# Altium PCB MainBoardPCB1.PcbDoc (part 9 of 40)
Units mm, origin at the board's own origin, x right, y up, seen from the top; angles counter-clockwise.
Board outline 258.95 x 308.86 mm, 16 copper layers (L1, L2 (GND), L3 (Sign), L4 (GND), L5 (Sign), L6 (PWR/GND), L7(PWR/GND), L8 (Plane_GND), L9 (PWR/GND), L10 (PWR/GND), L11 (PWR/GND), L12 (Sign), L13 (GND), L14 (Sign), L15 (GND), L16), stack 2.502 mm thick; 2397 components, 1744 nets, 8397 pads, 4112 vias.
Unrouted connection lines stored in the file: 3547.
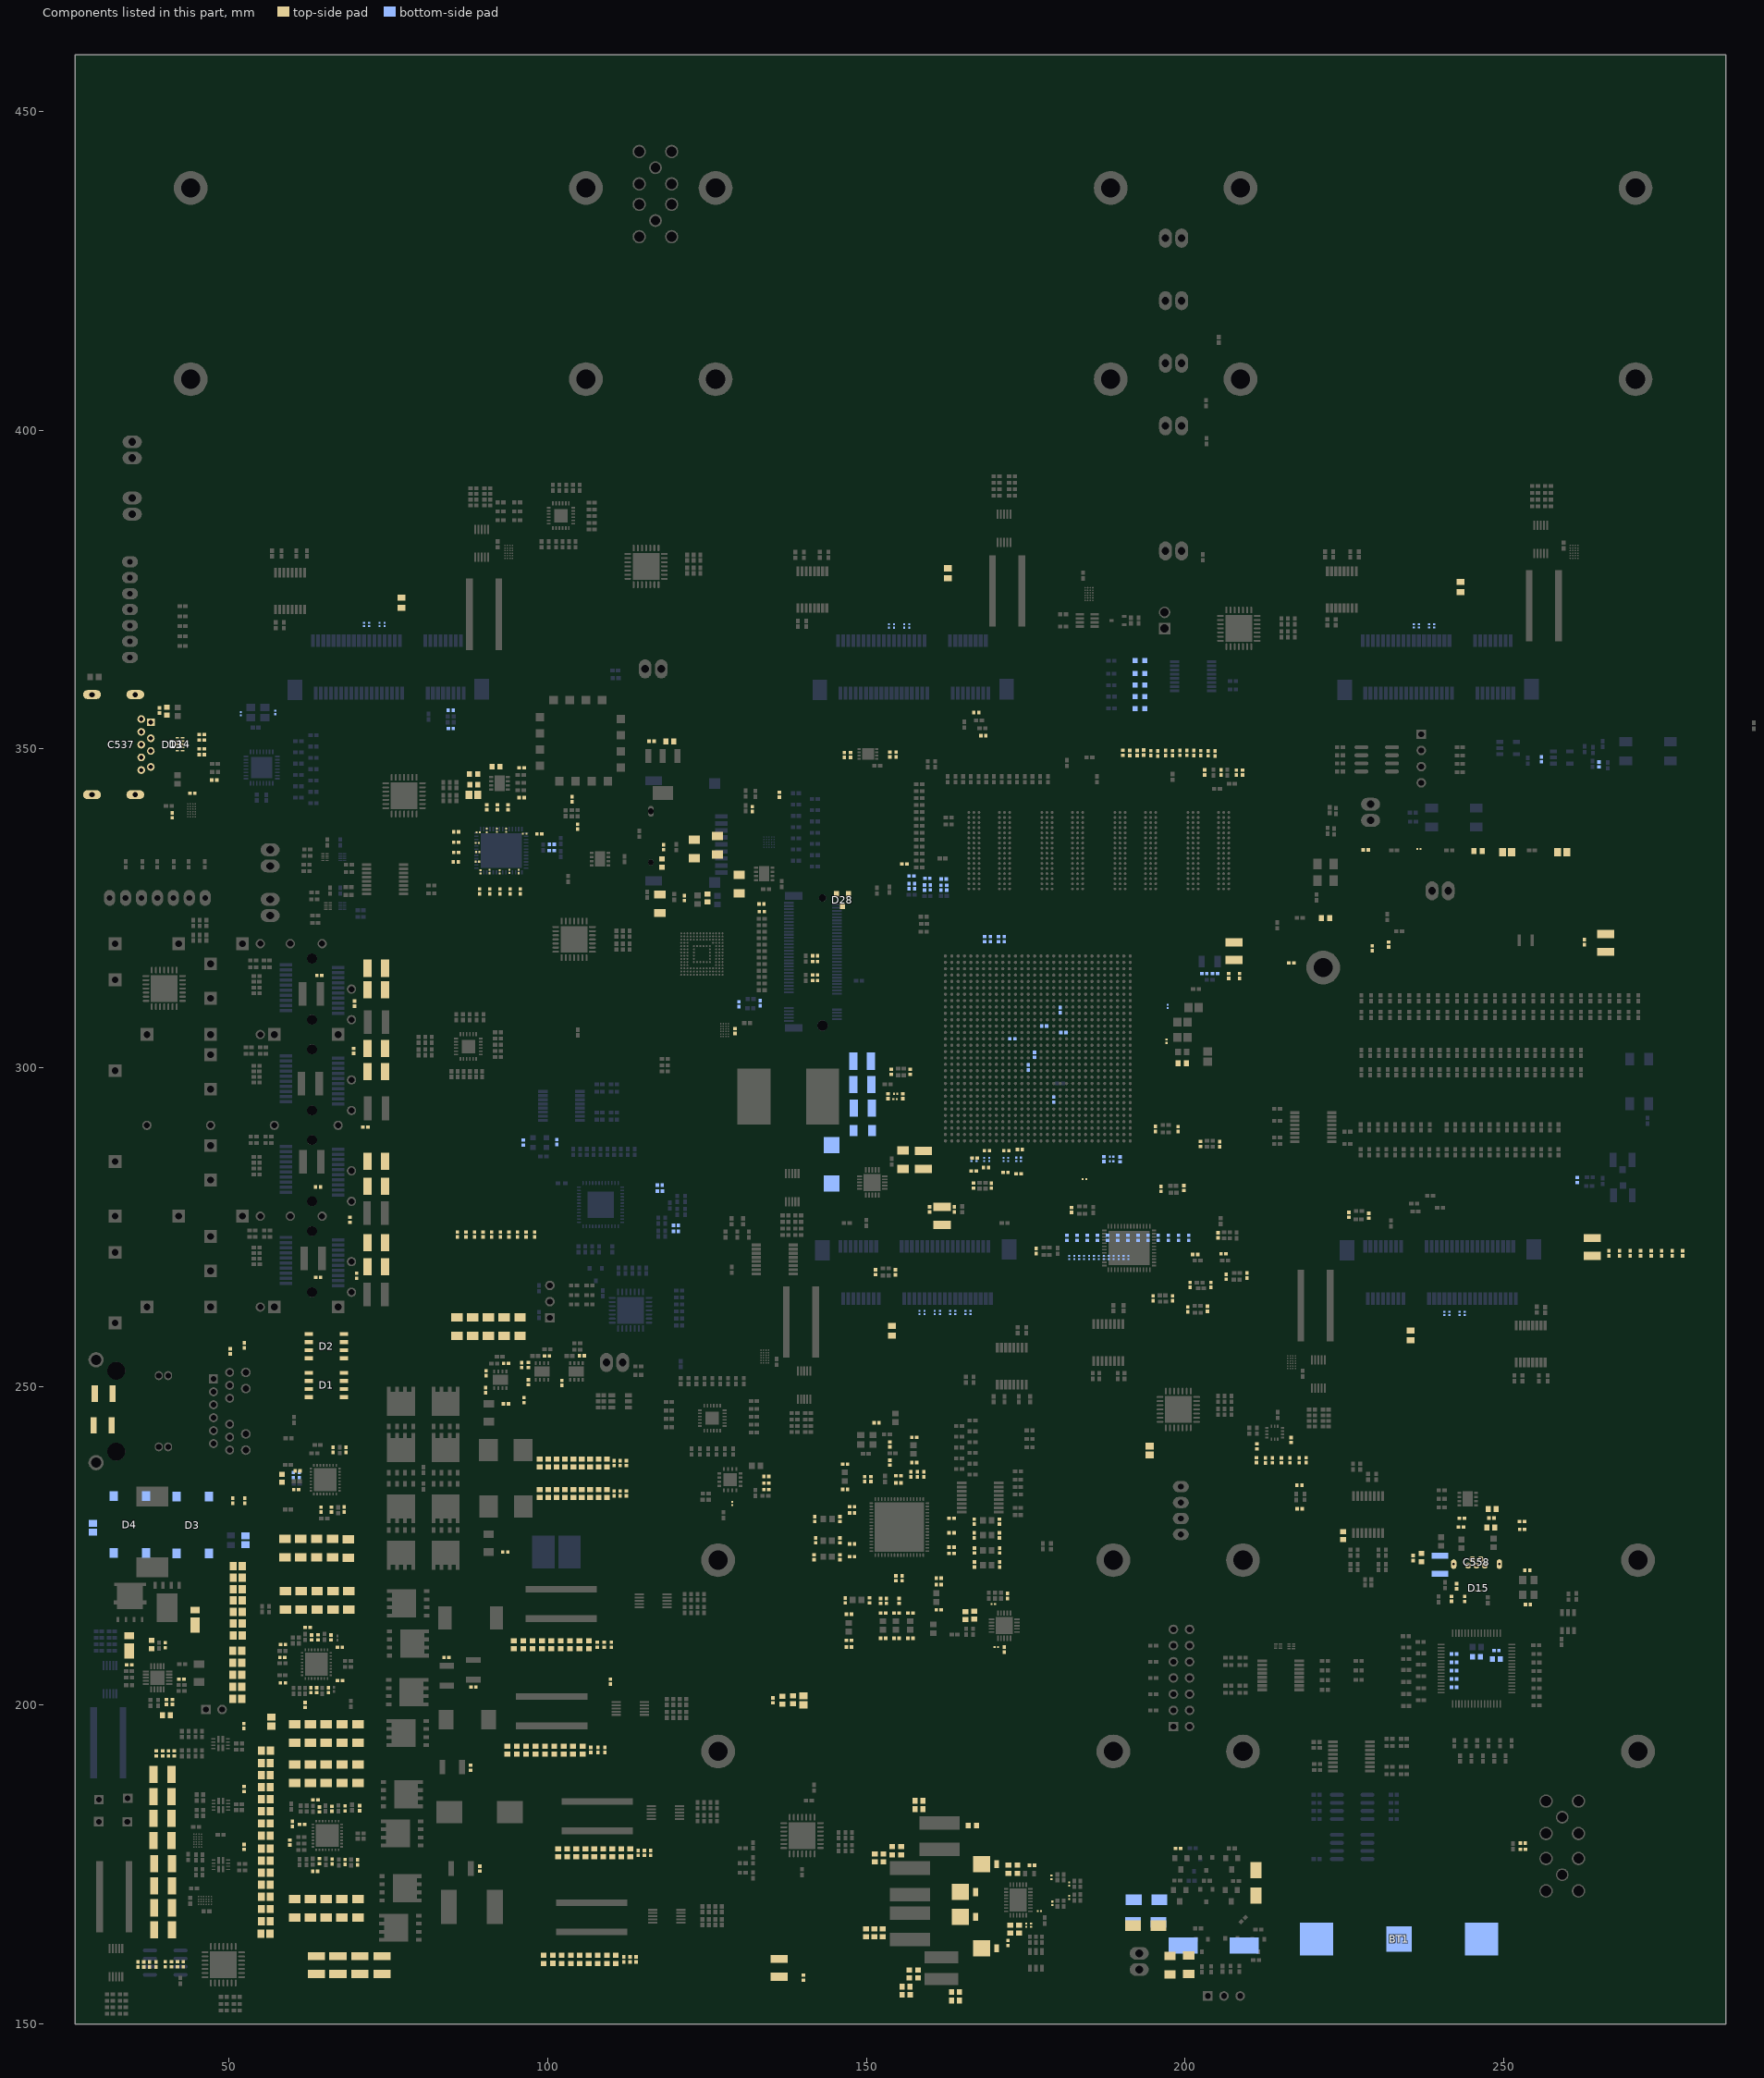
[diagram p19: the components of this part, seen from the top]

## Part data (continued)
C518 C520 C567_5V_to_3V3_for_FTDI C586 C587: library part Capacitor, "CAP CER 2.2UF 6.3V X5R 0402", Case/Package=0402, Case Code (Metric)=1005, Dielectric=X5R, Manufacturer="Taiyo Yuden", Manufacturer Part Number=JMK105BJ225KV-F, Max Operating Temperature=85°C, Min Operating Temperature=-55°C, Package Quantity=10000, Supplier Part Number 1=587-5867-1-ND, Tolerance=10%, Voltage Rating=6.3V, Capacitance=2.2uF, Case Code (Imperial)=0402, Category="Ceramic Capacitors", ComponentLink1Description=https://datasheet.ciiva.com/15921/tmk105b7103kv-15921011.pdf?src-supplier=Onlinecomponents.com, ComponentLink1URL=https://datasheet.ciiva.com/15921/tmk105b7103kv-15921011.pdf?src-supplier=Onlinecomponents.com, ComponentLink2Description=https://datasheet.ciiva.com/30178/cmultilayerceramiccapacitor-30178599.pdf?src-supplier=Onlinecomponents.com, ComponentLink2URL=https://datasheet.ciiva.com/30178/cmultilayerceramiccapacitor-30178599.pdf?src-supplier=Onlinecomponents.com, Composition=Ceramic, Depth=0.5mm, Height=0.5mm, Length=1mm, Mount="Surface Mount", Packaging="Tape and Reel", Pricing 1="1=0,10000, 10=0,06000, 100=0,02650, 500=0,01894, 1000=0,01488, 2500=0,01352, 5000=0,01244 (USD)", Radiation Hardening=No, RoHS=Yes, Stock 1=4812, Supplier 1=Digi-Key, Termination=SMD/SMT, Thickness=0.022inch, Voltage Rating (DC)=6.3V, Width=0.5mm
C525 C526 C527 C528 C529 C530: library part Capacitor, Case Code (Imperial)=0402, Case Code (Metric)=1005, Dielectric=X7R, Dielectric Material=Ceramic, Manufacturer=KEMET, Manufacturer Part Number=C0402C103K8RACAUTO, Max Operating Temperature=125°C, Min Operating Temperature=-55°C, Package Quantity=1, Ratings=AEC-Q200, Supplier Part Number 1=399-6827-1-ND, Tolerance=10%, Voltage Rating=10V, Capacitance=10nF, Case/Package=0402, ComponentLink1Description=https://datasheet.ciiva.com/6255/datasheetpn-c0402c103k8racauto-6255096.pdf?src-supplier=Digi-Key, ComponentLink1URL=https://datasheet.ciiva.com/6255/datasheetpn-c0402c103k8racauto-6255096.pdf?src-supplier=Digi-Key, Length=0.039inch, Mount="Surface Mount", Packaging="Cut Tape", Pricing 1="1 = 0,10000, 10 = 0,06800, 100 = 0,03020, 500 = 0,02158, 1000 = 0,01695, 2500 = 0,01541, 5000 = 0,01418 (USD)", REACH SVHC="No SVHC", RoHS=Yes, Stock 1=59295, Supplier 1=Digi-Key, Thickness=0.022inch, Voltage Rating (DC)=10V, Width=0.02inch
C531 C532 C533 C534 C588 C589 C592: library part Capacitor, "Cap Ceramic 0.1uF 25V X7R 20% SMD 0402 125C Paper T/R", Case Code (Imperial)=0402, Case Code (Metric)=1005, Dielectric=X7R, Manufacturer=Murata, Manufacturer Part Number=GRM155R71E104ME14D, Max Operating Temperature=125°C, Min Operating Temperature=-55°C, Package Quantity=10000, Supplier Part Number 1=490-13341-1-ND, Tolerance=20%, Voltage Rating=25V, Capacitance=100nF, Case/Package=0402, Category="Ceramic Capacitors", ComponentLink1Description=http://www.mouser.com/ds/2/281/c02e-2905.pdf?src-supplier=Mouser, ComponentLink1URL=http://www.mouser.com/ds/2/281/c02e-2905.pdf?src-supplier=Mouser, ComponentLink2Description=http://components.arrow.com/part/dataview/0323_07278596?src-supplier=Arrow+Europe, ComponentLink2URL=http://components.arrow.com/part/dataview/0323_07278596?src-supplier=Arrow+Europe, ComponentLink3Description=http://search.murata.co.jp/Ceramy/image/img/A01X/partnumbering_e_01.pdf?src-supplier=Digi-Key, ComponentLink3URL=http://search.murata.co.jp/Ceramy/image/img/A01X/partnumbering_e_01.pdf?src-supplier=Digi-Key, ComponentLink4Description=http://search.murata.co.jp/Ceramy/image/img/A01X/G101/ENG/GRM155R71E104ME14-01.pdf?src-supplier=Digi-Key, ComponentLink4URL=http://search.murata.co.jp/Ceramy/image/img/A01X/G101/ENG/GRM155R71E104ME14-01.pdf?src-supplier=Digi-Key, Composition=Ceramic, Depth=0.5mm, Height=0.5mm, Lead Free="Lead Free", Length=1mm, Material=Ceramic, Mount="Surface Mount", Packaging="Tape and Reel", Pricing 1="1=0,10000, 10=0,03800, 100=0,01680, 500=0,01198, 1000=0,00941, 2500=0,00855, 5000=0,00787 (USD)", RoHS=Yes, Stock 1=57604, Supplier 1=Digi-Key, Termination=SMD/SMT, Thickness=0.022inch, Voltage Rating (DC)=25V, Weight=0.000212oz, Width=0.5mm
C537: "WR-COM USB 3.0 Horizontal Type A", Manufacturer="Würth Elektronik eiSos GmbH", partNo=692121130100, ComponentLink1 Description=Manufacturer, ComponentLink1URL=http://www.we-online.de, ComponentLink2 Description=Datasheet, ComponentLink2URL=http://katalog.we-online.de/em/datasheet/692121130100.pdf, Created by="Karrer Zheng", Created Date=10/10/2014, NoPins=9
C548: library part Capacitor, Case/Package=0402, Case Code (Metric)=1005, Dielectric=C0G, Manufacturer=Yageo, Manufacturer Part Number=CC0402JRNPO9BN110, Max Operating Temperature=125°C, Min Operating Temperature=-55°C, Package Quantity=1, Supplier Part Number 1=311-1015-1-ND, Tolerance=5%, Voltage Rating=50V, Capacitance=11pF, Case Code (Imperial)=0402, ComponentLink1Description=https://datasheet.ciiva.com/176/mlccorderingcode-176688.pdf?src-supplier=Digi-Key, ComponentLink1URL=https://datasheet.ciiva.com/176/mlccorderingcode-176688.pdf?src-supplier=Digi-Key, ComponentLink2Description=https://datasheet.ciiva.com/176/mlccorderingcode-176689.pdf?src-supplier=Digi-Key, ComponentLink2URL=https://datasheet.ciiva.com/176/mlccorderingcode-176689.pdf?src-supplier=Digi-Key, ComponentLink3Description=https://datasheet.ciiva.com/17434/upy-gp-np0-16v-to-50v-8-17434328.pdf?src-supplier=Avnet+Europe, ComponentLink3URL=https://datasheet.ciiva.com/17434/upy-gp-np0-16v-to-50v-8-17434328.pdf?src-supplier=Avnet+Europe, ComponentLink4Description=https://datasheet.ciiva.com/11587/upy-gp-np0-16v-to-50v-8-11587082.pdf?src-supplier=Avnet, ComponentLink4URL=https://datasheet.ciiva.com/11587/upy-gp-np0-16v-to-50v-8-11587082.pdf?src-supplier=Avnet, ComponentLink5Description=https://datasheet.ciiva.com/176/mlccorderingcode-176687.pdf?src-supplier=Digi-Key, ComponentLink5URL=https://datasheet.ciiva.com/176/mlccorderingcode-176687.pdf?src-supplier=Digi-Key, Composition=Ceramic, Depth=0.5mm, Lead Free="Lead Free", Length=1mm, Mount="Surface Mount", Packaging="Tape and Reel", Pricing 1="1 = 0,10000, 10 = 0,05100, 100 = 0,02260, 500 = 0,01614, 1000 = 0,01267, 2500 = 0,01152, 5000 = 0,01060 (USD)", Radiation Hardening=No, RoHS=Yes, Stock 1=23241, Supplier 1=Digi-Key, Termination=SMD/SMT, Thickness=0.022inch, Voltage Rating (DC)=50V, Width=0.02inch
C549: library part Capacitor, Case/Package=0402, Case Code (Metric)=1005, Dielectric=X7R, Dielectric Material=Ceramic, Insulation Resistance=100GR, Manufacturer=Yageo, Manufacturer Part Number=CC0402KRX7R9BB221, Max Operating Temperature=125°C, Min Operating Temperature=-55°C, Package Quantity=1, Supplier Part Number 1=311-1035-1-ND, Tolerance=10%, Voltage Rating=50V, Capacitance=220pF, Case Code (Imperial)=0402, ComponentLink1Description=https://datasheet.ciiva.com/5789/1489800-5789552.pdf?src-supplier=Farnell, ComponentLink1URL=https://datasheet.ciiva.com/5789/1489800-5789552.pdf?src-supplier=Farnell, ComponentLink2Description=https://datasheet.ciiva.com/26862/getdatasheetpartid-403476-26862648.pdf?src-supplier=Verical, ComponentLink2URL=https://datasheet.ciiva.com/26862/getdatasheetpartid-403476-26862648.pdf?src-supplier=Verical, ComponentLink3Description=https://datasheet.ciiva.com/143/mlccorderingcode-143968.pdf?src-supplier=Digi-Key, ComponentLink3URL=https://datasheet.ciiva.com/143/mlccorderingcode-143968.pdf?src-supplier=Digi-Key, ComponentLink4Description=https://datasheet.ciiva.com/143/mlccorderingcode-143969.pdf?src-supplier=Digi-Key, ComponentLink4URL=https://datasheet.ciiva.com/143/mlccorderingcode-143969.pdf?src-supplier=Digi-Key, ComponentLink5Description=https://datasheet.ciiva.com/143/mlccorderingcode-143970.pdf?src-supplier=Digi-Key, ComponentLink5URL=https://datasheet.ciiva.com/143/mlccorderingcode-143970.pdf?src-supplier=Digi-Key, ComponentLink6Description=https://datasheet.ciiva.com/11464/upy-gphc-x7r-6-3v-to-50v-8-11464901.pdf?src-supplier=Avnet, ComponentLink6URL=https://datasheet.ciiva.com/11464/upy-gphc-x7r-6-3v-to-50v-8-11464901.pdf?src-supplier=Avnet, ComponentLink7Description=https://datasheet.ciiva.com/8033/1489800-8033623.pdf?src-supplier=Element14, ComponentLink7URL=https://datasheet.ciiva.com/8033/1489800-8033623.pdf?src-supplier=Element14, ComponentLink8Description=https://datasheet.ciiva.com/8033/1489800-8033624.pdf?src-supplier=Element14, ComponentLink8URL=https://datasheet.ciiva.com/8033/1489800-8033624.pdf?src-supplier=Element14, ComponentLink9Description=https://datasheet.ciiva.com/13209/upy-gp-np0-16v-to-50v-8-13209048.pdf?src-supplier=Mouser, ComponentLink9URL=https://datasheet.ciiva.com/13209/upy-gp-np0-16v-to-50v-8-13209048.pdf?src-supplier=Mouser, ComponentLink10Description=https://datasheet.ciiva.com/28450/1489800-28450392.pdf?src-supplier=Element14, ComponentLink10URL=https://datasheet.ciiva.com/28450/1489800-28450392.pdf?src-supplier=Element14, ComponentLink11Description=https://datasheet.ciiva.com/17437/upy-gphc-x7r-6-3v-to-50v-8-17437183.pdf?src-supplier=Avnet+Europe, ComponentLink11URL=https://datasheet.ciiva.com/17437/upy-gphc-x7r-6-3v-to-50v-8-17437183.pdf?src-supplier=Avnet+Europe, Composition=Ceramic, Depth=0.5mm, Halogen Free="Halogen Free", Height=0.5mm, Lead Free="Lead Free", Length=1mm, Mount="Surface Mount", Number of Pins=2, Packaging="Tape and Reel", Pricing 1="1 = 0,10000, 10 = 0,02600, 100 = 0,01180, 500 = 0,00844, 1000 = 0,00662, 2500 = 0,00602, 5000 = 0,00554 (USD)", Radiation Hardening=No, REACH SVHC="No SVHC", RoHS=Yes, Stock 1=92511, Supplier 1=Digi-Key, Termination=SMD/SMT, Thickness=0.022inch, Voltage Rating (DC)=50V, Weight=2.3E-05oz, Width=0.02inch
C551 C553 C555: library part Capacitor, "CAP CER 10UF 6.3V X5R 0402", Case/Package=0402, Case Code (Metric)=1005, Manufacturer=Murata, Manufacturer Part Number=GRJ155R60J106ME11D, Max Operating Temperature=85°C, Min Operating Temperature=-55°C, Supplier Part Number 1=490-13211-1-ND, Tolerance=20%, Voltage Rating=6.3V, Capacitance=10uF, Case Code (Imperial)=0402, Category="Ceramic Capacitors", ComponentLink1Description=http://psearch.en.murata.com/capacitor/product/GRJ155R60J106ME11%23.pdf?src-supplier=Digi-Key, ComponentLink1URL=http://psearch.en.murata.com/capacitor/product/GRJ155R60J106ME11%23.pdf?src-supplier=Digi-Key, Features="Soft Termination", Length=0.039inch, Mount="Surface Mount", Packaging="Cut Tape", Pricing 1="1=0,22000, 10=0,15100, 100=0,07660, 500=0,05242, 1000=0,04637, 2500=0,04435, 5000=0,04032 (USD)", RoHS=Yes, Stock 1=222391, Supplier 1=Digi-Key, Thickness=0.028inch, Width=0.02inch
C558: "WR-COM_USB_Micro Type B_Vertical_THT", Manufacturer="Würth Elektronik eiSos GmbH", partNo=614105150721, ComponentLink1 Description=Manufacturer, ComponentLink1URL=http://www.we-online.de, ComponentLink2 Description=Datasheet, ComponentLink2URL=http://katalog.we-online.de/em/datasheet/614105150721.pdf, Created by="Karrer Zheng", Created Date=10/25/2014, NoPins=5
C567_U_5V_to_3V31 C567_U_5V_to_3V32 C567_U_5V_to_3V33: library part Capacitor, "CAP CER 2.2UF 6.3V X5R 0402", Case Code (Imperial)=0402, Case Code (Metric)=1005, Dielectric=X5R, Manufacturer="Taiyo Yuden", Manufacturer Part Number=JMK105BJ225KV-F, Max Operating Temperature=85°C, Min Operating Temperature=-55°C, Package Quantity=10000, Supplier Part Number 1=587-5867-1-ND, Tolerance=10%, Voltage Rating=6.3V, Capacitance=2.2uF, Case/Package=0402, Category="Ceramic Capacitors", ComponentLink1Description=https://datasheet.ciiva.com/15921/tmk105b7103kv-15921011.pdf?src-supplier=Onlinecomponents.com, ComponentLink1URL=https://datasheet.ciiva.com/15921/tmk105b7103kv-15921011.pdf?src-supplier=Onlinecomponents.com, ComponentLink2Description=https://datasheet.ciiva.com/30178/cmultilayerceramiccapacitor-30178599.pdf?src-supplier=Onlinecomponents.com, ComponentLink2URL=https://datasheet.ciiva.com/30178/cmultilayerceramiccapacitor-30178599.pdf?src-supplier=Onlinecomponents.com, Composition=Ceramic, Depth=0.5mm, Height=0.5mm, Length=1mm, Mount="Surface Mount", Packaging="Tape and Reel", Pricing 1="1=0,10000, 10=0,06000, 100=0,02650, 500=0,01894, 1000=0,01488, 2500=0,01352, 5000=0,01244 (USD)", Radiation Hardening=No, RoHS=Yes, Stock 1=4812, Supplier 1=Digi-Key, Termination=SMD/SMT, Thickness=0.022inch, Voltage Rating (DC)=6.3V, Width=0.5mm
C571 C719: library part Capacitor, "CAP CER 1000PF 25V X5R 0201", Case/Package=0201, Dielectric=X5R, Manufacturer=Murata, Manufacturer Part Number=GRM033R61E102KA01D, Max Operating Temperature=85°C, Min Operating Temperature=-55°C, Supplier Part Number 1=490-14452-1-ND, Tolerance=10%, Voltage Rating (DC)=25V, Capacitance=1nF, Category="Ceramic Capacitors", ComponentLink1Description=http://components.arrow.com/part/dataview/0323_06094941?src-supplier=Arrow+Europe, ComponentLink1URL=http://components.arrow.com/part/dataview/0323_06094941?src-supplier=Arrow+Europe, ComponentLink2Description=https://search.murata.co.jp/Ceramy/image/img/A01X/G101/ENG/GRM033R61E102KA01-01.pdf?src-supplier=Digi-Key, ComponentLink2URL=https://search.murata.co.jp/Ceramy/image/img/A01X/G101/ENG/GRM033R61E102KA01-01.pdf?src-supplier=Digi-Key, ComponentLink3Description=http://search.murata.co.jp/Ceramy/image/img/A01X/G101/ENG/GRM033R61E102KA01-01.pdf?src-supplier=Digi-Key, ComponentLink3URL=http://search.murata.co.jp/Ceramy/image/img/A01X/G101/ENG/GRM033R61E102KA01-01.pdf?src-supplier=Digi-Key, Depth=0.3mm, Length=0.6mm, Packaging="Tape and Reel", Pricing 1="1=0,10000, 10=0,01800, 100=0,00790, 500=0,00564, 1000=0,00443, 2500=0,00402, 5000=0,00370 (USD)", RoHS=Yes, Stock 1=80983, Supplier 1=Digi-Key, Thickness=300um, Width=300um
C595 C596 C695 C696 C697 C698 C699: library part Capacitor, Dielectric=X5R, Manufacturer=Murata, Manufacturer Part Number=GRM21BR61H106KE43L, Supplier Part Number 1=490-18663-1-ND, Tolerance=10%, Voltage Rating (DC)=50V, Capacitance=10uF, Category="Ceramic Capacitors", Length=2mm, Pricing 1="1=0,49000, 10=0,33800, 100=0,20270, 500=0,15198, 1000=0,12835 (USD)", RoHS=No, Stock 1=3437, Supplier 1=Digi-Key, Thickness=1.25mm, Width=1.25mm
C597: library part Capacitor, "MURATA - GRT155R61E105KE01D - SMD Multilayer Ceramic Capacitor, 1 µF, 25 V, 0402 [1005 Metric], ± 10%, X5R, GRT Series - SMD Multilayer Ceramic Capacitor, 1 µF, 25 V, 0402 [1005 Metric], ± 10%, X5R, GRT Series", Case Code (Imperial)=0402, Case Code (Metric)=1005, Dielectric=X5R, Manufacturer=Murata, Manufacturer Part Number=GRT155R61E105KE01D, Max Operating Temperature=85°C, Min Operating Temperature=-55°C, Ratings=AEC-Q200, Supplier Part Number 1=490-12263-1-ND, Tolerance=10%, Voltage Rating=25V, Capacitance=1uF, Case/Package=0402, Category="Ceramic Capacitors", ComponentLink1Description=http://www.farnell.com/datasheets/2165918.pdf?src-supplier=Farnell, ComponentLink1URL=http://www.farnell.com/datasheets/2165918.pdf?src-supplier=Farnell, ComponentLink2Description=http://search.murata.co.jp/Ceramy/image/img/A01X/G101/ENG/GRT155R61E105KE01-01.pdf?src-supplier=Digi-Key, ComponentLink2URL=http://search.murata.co.jp/Ceramy/image/img/A01X/G101/ENG/GRT155R61E105KE01-01.pdf?src-supplier=Digi-Key, ComponentLink3Description=http://www.farnell.com/datasheets/2165918.pdf?src-supplier=Element14, ComponentLink3URL=http://www.farnell.com/datasheets/2165918.pdf?src-supplier=Element14, Length=0.039inch, Mount="Surface Mount", Packaging="Tape and Reel", Pricing 1="1=0,18000, 10=0,12300, 100=0,06210, 500=0,04248, 1000=0,03758, 2500=0,03594, 5000=0,03268 (USD)", RoHS=Yes, Stock 1=341453, Supplier 1=Digi-Key, Thickness=0.022inch, Voltage Rating (DC)=25V, Width=0.02inch
C603 C612: library part Capacitor, Case Code (Imperial)=0201, Case Code (Metric)=0603, Dielectric=C0G, Manufacturer=Murata, Manufacturer Part Number=GRM0335C1H430GA01D, Max Operating Temperature=125°C, Min Operating Temperature=-55°C, Package Quantity=15000, Supplier Part Number 1=490-14799-1-ND, Tolerance=2%, Voltage Rating=50V, Capacitance=43pF, Case/Package=0201, ComponentLink1Description=http://components.arrow.com/part/dataview/0323_07279725?src-supplier=Arrow+Europe, ComponentLink1URL=http://components.arrow.com/part/dataview/0323_07279725?src-supplier=Arrow+Europe, ComponentLink2Description=http://www.mouser.com/ds/2/281/c02e-2905.pdf?src-supplier=Mouser, ComponentLink2URL=http://www.mouser.com/ds/2/281/c02e-2905.pdf?src-supplier=Mouser, ComponentLink3Description=http://components.arrow.com/part/dataview/55790600S306921N2606?src-supplier=Arrow, ComponentLink3URL=http://components.arrow.com/part/dataview/55790600S306921N2606?src-supplier=Arrow, ComponentLink4Description=https://search.murata.co.jp/Ceramy/image/img/A01X/G101/ENG/GRM0335C1H430GA01-01.pdf?src-supplier=Digi-Key, ComponentLink4URL=https://search.murata.co.jp/Ceramy/image/img/A01X/G101/ENG/GRM0335C1H430GA01-01.pdf?src-supplier=Digi-Key, ComponentLink5Description=http://search.murata.co.jp/Ceramy/image/img/A01X/partnumbering_e_01.pdf?src-supplier=Digi-Key, ComponentLink5URL=http://search.murata.co.jp/Ceramy/image/img/A01X/partnumbering_e_01.pdf?src-supplier=Digi-Key, ComponentLink6Description=http://psearch.en.murata.com/capacitor/product/GRM0335C1H430GA01%23.pdf?src-supplier=Avnet, ComponentLink6URL=http://psearch.en.murata.com/capacitor/product/GRM0335C1H430GA01%23.pdf?src-supplier=Avnet, Depth=0.3mm, Lead Free="Lead Free", Length=0.024inch, Mount="Surface Mount", Packaging="Tape and Reel", Pricing 1="1 = 0,10000, 10 = 0,01800, 100 = 0,00810, 500 = 0,00578, 1000 = 0,00454, 2500 = 0,00412, 5000 = 0,00380 (USD)", RoHS=Yes, Stock 1=52010, Supplier 1=Digi-Key, Termination=SMD/SMT, Thickness=0.012inch, Voltage Rating (DC)=50V, Width=0.012inch
C604: library part Capacitor, "SMT Capacitor", Part Number=CL05A105MQ5NNNC, Supplier Part Number 1=1276-1235-6-ND, Supplier 1=Digi-Key
C605 C616: library part Capacitor, Case Code (Imperial)=0201, Case Code (Metric)=0603, Dielectric=C0G, Manufacturer=Murata, Manufacturer Part Number=GRM0335C1E101JA01D, Max Operating Temperature=125°C, Min Operating Temperature=-55°C, Package Quantity=15000, Supplier Part Number 1=490-3160-1-ND, Tolerance=5%, Voltage=25V, Capacitance=100pF, Case/Package=0201, ComponentLink1Description=https://datasheet.ciiva.com/16497/grm0335c1e101ja01-01-16497112.pdf?src-supplier=Future+Electronics, ComponentLink1URL=https://datasheet.ciiva.com/16497/grm0335c1e101ja01-01-16497112.pdf?src-supplier=Future+Electronics, ComponentLink2Description=https://datasheet.ciiva.com/18697/product-18697797.pdf?src-supplier=Digi-Key, ComponentLink2URL=https://datasheet.ciiva.com/18697/product-18697797.pdf?src-supplier=Digi-Key, Depth=0.3mm, Height=0.3mm, Lead Free="Lead Free", Length=0.6mm, Mount="Surface Mount", Packaging="Tape and Reel", Pricing 1="1 = 0,10000, 10 = 0,01300, 100 = 0,00560, 500 = 0,00400, 1000 = 0,00315, 2500 = 0,00286, 5000 = 0,00263 (USD)", Radiation Hardening=No, REACH SVHC="No SVHC", RoHS=Yes, Stock 1=1884783, Supplier 1=Digi-Key, Termination=SMD/SMT, Thickness=0.013inch, Voltage Rating=25V, Voltage Rating (DC)=25V, Width=0.012inch
C609: "Supercapacitors / Ultracapacitors 0.22F 5.5volts SMD Super Capacitor", Capacitance=220mF, Case/Package=Radial, ESR (Equivalent Series Resistance)=25R, Leakage Current=330uA, Manufacturer=KEMET, Max Operating Temperature=70°C, Min Operating Temperature=-25°C, Package Quantity=500, Supplier Part Number 1=18X4838, Tolerance=80%, Voltage=5.5V, Category=Capacitors, ComponentLink1Description=https://datasheet.ciiva.com/29533/docfinderpartnumber-fc0h224zftbr24-29533957.pdf?src-supplier=Digi-Key, ComponentLink1URL=https://datasheet.ciiva.com/29533/docfinderpartnumber-fc0h224zftbr24-29533957.pdf?src-supplier=Digi-Key, ComponentLink2Description=https://datasheet.ciiva.com/46644/70368307-46644566.pdf?src-supplier=Allied+Electronics, ComponentLink2URL=https://datasheet.ciiva.com/46644/70368307-46644566.pdf?src-supplier=Allied+Electronics, ComponentLink3Description=https://datasheet.ciiva.com/28448/1754672-28448906.pdf?src-supplier=Element14, ComponentLink3URL=https://datasheet.ciiva.com/28448/1754672-28448906.pdf?src-supplier=Element14, ComponentLink4Description=https://datasheet.ciiva.com/29984/kem-s6011-fc-29984986.pdf?src-supplier=Avnet, ComponentLink4URL=https://datasheet.ciiva.com/29984/kem-s6011-fc-29984986.pdf?src-supplier=Avnet, Depth=8.5mm, Diameter=10.5mm, Height=8.5mm, Height - Seated (Max)=0.335inch, Lead Pitch=5mm, Length=10.8mm, Manufacturer Part Number=FC0H224ZFTBR24, Mount="Surface Mount", Packaging="Tape and Reel", Radiation Hardening=No, REACH SVHC="No SVHC", RoHS=Yes, Supplier 1=Newark, Termination=SMD/SMT, Voltage Rating=5.5V, Voltage Rating (DC)=5.5V, Width=10.8mm
C624 C625 C626: library part Capacitor, Case/Package=0201, Case Code (Metric)=0603, Dielectric=X5R, Manufacturer=Yageo, Manufacturer Part Number=CC0201KRX5R7BB103, Max Operating Temperature=85°C, Min Operating Temperature=-55°C, Supplier Part Number 1=311-1596-1-ND, Tolerance=10%, Voltage Rating=16V, Capacitance=10nF, Case Code (Imperial)=0201, ComponentLink1Description=http://components.arrow.com/part/dataview/0323_04166367?src-supplier=Arrow+Europe, ComponentLink1URL=http://components.arrow.com/part/dataview/0323_04166367?src-supplier=Arrow+Europe, ComponentLink2Description=http://www.mouser.com/ds/2/447/UPY-GPHC_X5R_4V-to-50V_25-1131599.pdf?src-supplier=Mouser, ComponentLink2URL=http://www.mouser.com/ds/2/447/UPY-GPHC_X5R_4V-to-50V_25-1131599.pdf?src-supplier=Mouser, ComponentLink3Description=http://www.yageo.com/documents/recent/UPY-GPHC_X5R_4V-to-50V_25.pdf?src-supplier=Digi-Key, ComponentLink3URL=http://www.yageo.com/documents/recent/UPY-GPHC_X5R_4V-to-50V_25.pdf?src-supplier=Digi-Key, Composition=Ceramic, Depth=0.3mm, Halogen Free="Halogen Free", Lead Free="Lead Free", Length=0.024inch, Mount="Surface Mount", Packaging="Tape and Reel", Pricing 1="1 = 0,10000, 10 = 0,01800, 100 = 0,00810, 500 = 0,00582, 1000 = 0,00457, 2500 = 0,00415, 5000 = 0,00382 (USD)", RoHS=Yes, Stock 1=521889, Supplier 1=Digi-Key, Termination=SMD/SMT, Thickness=0.013inch, Voltage Rating (DC)=16V, Weight=6E-06oz, Width=0.012inch
C627: library part Capacitor, "CAP CER 0.1UF 16V X5R 0201", Case/Package=0201, Case Code (Metric)=0603, Dielectric=X5R, Manufacturer=Murata, Manufacturer Part Number=GRM033R61C104ME84D, Max Operating Temperature=85°C, Min Operating Temperature=-55°C, Package Quantity=15000, Supplier Part Number 1=490-9986-1-ND, Tolerance=20%, Voltage Rating=16V, Capacitance=100nF, Case Code (Imperial)=0201, Category="Ceramic Capacitors", ComponentLink1Description=http://www.mouser.com/ds/2/281/c02e-2905.pdf?src-supplier=Mouser, ComponentLink1URL=http://www.mouser.com/ds/2/281/c02e-2905.pdf?src-supplier=Mouser, ComponentLink2Description=http://search.murata.co.jp/Ceramy/image/img/A01X/G101/ENG/GRM033R61C104ME84-01.pdf?src-supplier=Digi-Key, ComponentLink2URL=http://search.murata.co.jp/Ceramy/image/img/A01X/G101/ENG/GRM033R61C104ME84-01.pdf?src-supplier=Digi-Key, Height=0.3mm, Length=0.024inch, Mount="Surface Mount", Packaging="Tape and Reel", Pricing 1="1=0,10000, 10=0,06000, 100=0,02670, 500=0,01906, 1000=0,01497, 2500=0,01361, 5000=0,01252 (USD)", RoHS=Yes, Stock 1=519119, Supplier 1=Digi-Key, Termination=SMD/SMT, Thickness=0.013inch, Voltage Rating (DC)=16V, Weight=1.2E-05oz, Width=0.3mm
C628: library part Capacitor, "Multilayer Ceramic Capacitors MLCC - SMD/SMT 470nF 6.3V X5R 10%", Case/Package=0402, Case Code (Metric)=1005, Dielectric=X5R, Manufacturer=Yageo, Manufacturer Part Number=CC0402KRX5R5BB474, Max Operating Temperature=85°C, Min Operating Temperature=-55°C, Supplier Part Number 1=311-1684-1-ND, Tolerance=10%, Voltage Rating=6.3V, Capacitance=470nF, Case Code (Imperial)=0402, Category="Ceramic Capacitors", ComponentLink1Description=http://components.arrow.com/part/dataview/0323_00776134?src-supplier=Arrow+Europe, ComponentLink1URL=http://components.arrow.com/part/dataview/0323_00776134?src-supplier=Arrow+Europe, ComponentLink2Description=http://www.mouser.com/ds/2/447/UPY-GPHC_X5R_4V-to-50V_25-1131599.pdf?src-supplier=Mouser, ComponentLink2URL=http://www.mouser.com/ds/2/447/UPY-GPHC_X5R_4V-to-50V_25-1131599.pdf?src-supplier=Mouser, ComponentLink3Description=http://www.yageo.com/documents/recent/UPY-GPHC_X5R_4V-to-50V-16.pdf?src-supplier=Future+Electronics, ComponentLink3URL=http://www.yageo.com/documents/recent/UPY-GPHC_X5R_4V-to-50V-16.pdf?src-supplier=Future+Electronics, ComponentLink4Description=http://www.yageo.com/documents/recent/UPY-GPHC_X5R_4V-to-50V_12.pdf?src-supplier=Avnet, ComponentLink4URL=http://www.yageo.com/documents/recent/UPY-GPHC_X5R_4V-to-50V_12.pdf?src-supplier=Avnet, ComponentLink5Description=http://www.yageo.com/documents/recent/UPY-GPHC_X5R_4V-to-50V_10.pdf?src-supplier=Avnet+Europe, ComponentLink5URL=http://www.yageo.com/documents/recent/UPY-GPHC_X5R_4V-to-50V_10.pdf?src-supplier=Avnet+Europe, ComponentLink6Description=http://www.yageo.com/exep/pages/download/literatures/ProductSelectionGuide%202014_Final_2.pdf?src-supplier=Digi-Key, ComponentLink6URL=http://www.yageo.com/exep/pages/download/literatures/ProductSelectionGuide%202014_Final_2.pdf?src-supplier=Digi-Key, ComponentLink7Description=http://www.yageo.com/documents/recent/UPY-GPHC_X5R_4V-to-50V_25.pdf?src-supplier=Digi-Key, ComponentLink7URL=http://www.yageo.com/documents/recent/UPY-GPHC_X5R_4V-to-50V_25.pdf?src-supplier=Digi-Key, ComponentLink8Description=https://www.verical.com/server-webapp/html/getDatasheet?partID=376669&src-supplier=Verical, ComponentLink8URL=https://www.verical.com/server-webapp/html/getDatasheet?partID=376669&src-supplier=Verical, Composition=Ceramic, Depth=0.5mm, Halogen Free="Halogen Free", Height=0.5mm, Lead Free="Lead Free", Length=1mm, Mount="Surface Mount", Number of Pins=2, Packaging="Tape and Reel", Pricing 1="1=0,10000, 10=0,07000, 100=0,03130, 500=0,02236, 1000=0,01758, 2500=0,01598, 5000=0,01470 (USD)", Radiation Hardening=No, RoHS=Yes, Stock 1=102175, Supplier 1=Digi-Key, Termination=SMD/SMT, Thickness=0.022inch, Voltage Rating (DC)=6.3V, Weight=2.3E-05oz, Width=0.02inch
C630 C632: library part Capacitor, "Multilayer Ceramic Capacitors MLCC - SMD/SMT 470nF 6.3V X5R 10%", Case Code (Imperial)=0402, Case Code (Metric)=1005, Dielectric=X5R, Manufacturer=Yageo, Manufacturer Part Number=CC0402KRX5R5BB474, Max Operating Temperature=85°C, Min Operating Temperature=-55°C, Supplier Part Number 1=311-1684-1-ND, Tolerance=10%, Voltage Rating=6.3V, Capacitance=470nF, Case/Package=0402, Category="Ceramic Capacitors", ComponentLink1Description=http://components.arrow.com/part/dataview/0323_00776134?src-supplier=Arrow+Europe, ComponentLink1URL=http://components.arrow.com/part/dataview/0323_00776134?src-supplier=Arrow+Europe, ComponentLink2Description=http://www.mouser.com/ds/2/447/UPY-GPHC_X5R_4V-to-50V_25-1131599.pdf?src-supplier=Mouser, ComponentLink2URL=http://www.mouser.com/ds/2/447/UPY-GPHC_X5R_4V-to-50V_25-1131599.pdf?src-supplier=Mouser, ComponentLink3Description=http://www.yageo.com/documents/recent/UPY-GPHC_X5R_4V-to-50V-16.pdf?src-supplier=Future+Electronics, ComponentLink3URL=http://www.yageo.com/documents/recent/UPY-GPHC_X5R_4V-to-50V-16.pdf?src-supplier=Future+Electronics, ComponentLink4Description=http://www.yageo.com/documents/recent/UPY-GPHC_X5R_4V-to-50V_12.pdf?src-supplier=Avnet, ComponentLink4URL=http://www.yageo.com/documents/recent/UPY-GPHC_X5R_4V-to-50V_12.pdf?src-supplier=Avnet, ComponentLink5Description=http://www.yageo.com/documents/recent/UPY-GPHC_X5R_4V-to-50V_10.pdf?src-supplier=Avnet+Europe, ComponentLink5URL=http://www.yageo.com/documents/recent/UPY-GPHC_X5R_4V-to-50V_10.pdf?src-supplier=Avnet+Europe, ComponentLink6Description=http://www.yageo.com/exep/pages/download/literatures/ProductSelectionGuide%202014_Final_2.pdf?src-supplier=Digi-Key, ComponentLink6URL=http://www.yageo.com/exep/pages/download/literatures/ProductSelectionGuide%202014_Final_2.pdf?src-supplier=Digi-Key, ComponentLink7Description=http://www.yageo.com/documents/recent/UPY-GPHC_X5R_4V-to-50V_25.pdf?src-supplier=Digi-Key, ComponentLink7URL=http://www.yageo.com/documents/recent/UPY-GPHC_X5R_4V-to-50V_25.pdf?src-supplier=Digi-Key, ComponentLink8Description=https://www.verical.com/server-webapp/html/getDatasheet?partID=376669&src-supplier=Verical, ComponentLink8URL=https://www.verical.com/server-webapp/html/getDatasheet?partID=376669&src-supplier=Verical, Composition=Ceramic, Depth=0.5mm, Halogen Free="Halogen Free", Height=0.5mm, Lead Free="Lead Free", Length=1mm, Mount="Surface Mount", Number of Pins=2, Packaging="Tape and Reel", Pricing 1="1=0,10000, 10=0,07000, 100=0,03130, 500=0,02236, 1000=0,01758, 2500=0,01598, 5000=0,01470 (USD)", Radiation Hardening=No, RoHS=Yes, Stock 1=102175, Supplier 1=Digi-Key, Termination=SMD/SMT, Thickness=0.022inch, Voltage Rating (DC)=6.3V, Weight=2.3E-05oz, Width=0.02inch
C633 C636: library part Capacitor, Case/Package=0402, Case Code (Metric)=1005, Dielectric=U2J, Manufacturer=Murata, Manufacturer Part Number=GRM1557U1A302JA01D, Max Operating Temperature=125°C, Min Operating Temperature=-55°C, Package Quantity=10000, Supplier Part Number 1=490-8243-1-ND, Tolerance=5%, Voltage Rating=10V, Capacitance=3nF, Case Code (Imperial)=0402, ComponentLink1Description=https://datasheet.ciiva.com/11620/product-11620441.pdf?src-supplier=Avnet, ComponentLink1URL=https://datasheet.ciiva.com/11620/product-11620441.pdf?src-supplier=Avnet, ComponentLink2Description=https://datasheet.ciiva.com/29542/partnumbering-e-01-29542685.pdf?src-supplier=Digi-Key, ComponentLink2URL=https://datasheet.ciiva.com/29542/partnumbering-e-01-29542685.pdf?src-supplier=Digi-Key, ComponentLink3Description=https://datasheet.ciiva.com/29542/partnumbering-e-01-29542686.pdf?src-supplier=Digi-Key, ComponentLink3URL=https://datasheet.ciiva.com/29542/partnumbering-e-01-29542686.pdf?src-supplier=Digi-Key, ComponentLink4Description=https://datasheet.ciiva.com/29542/partnumbering-e-01-29542687.pdf?src-supplier=Digi-Key, ComponentLink4URL=https://datasheet.ciiva.com/29542/partnumbering-e-01-29542687.pdf?src-supplier=Digi-Key, Depth=0.5mm, Height=0.5mm, Lead Free="Lead Free", Length=1mm, Mount="Surface Mount", Packaging="Tape and Reel", Pricing 1="1 = 0,22000, 10 = 0,14700, 100 = 0,07450, 500 = 0,05100, 1000 = 0,04511, 2500 = 0,04315, 5000 = 0,03923 (USD)", Radiation Hardening=No, RoHS=Yes, Stock 1=13189, Supplier 1=Digi-Key, Termination=SMD/SMT, Thickness=0.022inch, Voltage Rating (DC)=10V, Width=0.5mm
C634: library part Capacitor, Case/Package=0402, Case Code (Metric)=1005, Dielectric=X7R, Dielectric Material=Ceramic, Insulation Resistance=100GR, Manufacturer=Yageo, Manufacturer Part Number=CC0402KRX7R9BB331, Max Operating Temperature=125°C, Min Operating Temperature=-55°C, Package Quantity=1, Supplier Part Number 1=311-1027-1-ND, Tolerance=10%, Voltage Rating=50V, Capacitance=330pF, Case Code (Imperial)=0402, ComponentLink1Description=https://datasheet.ciiva.com/143/mlccorderingcode-143965.pdf?src-supplier=Digi-Key, ComponentLink1URL=https://datasheet.ciiva.com/143/mlccorderingcode-143965.pdf?src-supplier=Digi-Key, ComponentLink2Description=https://datasheet.ciiva.com/143/mlccorderingcode-143966.pdf?src-supplier=Digi-Key, ComponentLink2URL=https://datasheet.ciiva.com/143/mlccorderingcode-143966.pdf?src-supplier=Digi-Key, ComponentLink3Description=https://datasheet.ciiva.com/143/mlccorderingcode-143967.pdf?src-supplier=Digi-Key, ComponentLink3URL=https://datasheet.ciiva.com/143/mlccorderingcode-143967.pdf?src-supplier=Digi-Key, ComponentLink4Description=https://datasheet.ciiva.com/7978/1489800-7978101.pdf?src-supplier=Element14, ComponentLink4URL=https://datasheet.ciiva.com/7978/1489800-7978101.pdf?src-supplier=Element14, ComponentLink5Description=https://datasheet.ciiva.com/5425/upy-gphc-x7r-6-3v-to-50v-8-5425451.pdf?src-supplier=Mouser, ComponentLink5URL=https://datasheet.ciiva.com/5425/upy-gphc-x7r-6-3v-to-50v-8-5425451.pdf?src-supplier=Mouser, ComponentLink6Description=https://datasheet.ciiva.com/8033/1489800-8033628.pdf?src-supplier=Element14, ComponentLink6URL=https://datasheet.ciiva.com/8033/1489800-8033628.pdf?src-supplier=Element14, ComponentLink7Description=https://datasheet.ciiva.com/11464/upy-gphc-x7r-6-3v-to-50v-8-11464908.pdf?src-supplier=Avnet, ComponentLink7URL=https://datasheet.ciiva.com/11464/upy-gphc-x7r-6-3v-to-50v-8-11464908.pdf?src-supplier=Avnet, ComponentLink8Description=https://datasheet.ciiva.com/46394/1489800-46394572.pdf?src-supplier=Element14, ComponentLink8URL=https://datasheet.ciiva.com/46394/1489800-46394572.pdf?src-supplier=Element14, ComponentLink9Description=https://datasheet.ciiva.com/8033/1489800-8033629.pdf?src-supplier=Element14, ComponentLink9URL=https://datasheet.ciiva.com/8033/1489800-8033629.pdf?src-supplier=Element14, Composition=Ceramic, Depth=0.5mm, Halogen Free="Halogen Free", Height=0.5mm, Lead Free="Lead Free", Length=1mm, Mount="Surface Mount", Packaging="Tape and Reel", Pricing 1="1 = 0,10000, 10 = 0,03000, 100 = 0,01350, 500 = 0,00966, 1000 = 0,00759, 2500 = 0,00690, 5000 = 0,00635 (USD)", Radiation Hardening=No, REACH SVHC="No SVHC", RoHS=Yes, Stock 1=223776, Supplier 1=Digi-Key, Termination=SMD/SMT, Thickness=0.022inch, Voltage Rating (DC)=50V, Width=0.5mm
C635: library part Capacitor, Case/Package=0402, Case Code (Metric)=1005, Dielectric=X7R, Manufacturer=Yageo, Manufacturer Part Number=CC0402KRX7R9BB682, Max Operating Temperature=125°C, Min Operating Temperature=-55°C, Supplier Part Number 1=311-1726-1-ND, Tolerance=10%, Voltage=50V, Capacitance=6.8nF, Case Code (Imperial)=0402, ComponentLink1Description=https://datasheet.ciiva.com/11786/0900766b8079c870-11786013.pdf?src-supplier=RSComponents, ComponentLink1URL=https://datasheet.ciiva.com/11786/0900766b8079c870-11786013.pdf?src-supplier=RSComponents, ComponentLink2Description=https://datasheet.ciiva.com/17437/upy-gphc-x7r-6-3v-to-50v-8-17437372.pdf?src-supplier=Avnet+Europe, ComponentLink2URL=https://datasheet.ciiva.com/17437/upy-gphc-x7r-6-3v-to-50v-8-17437372.pdf?src-supplier=Avnet+Europe, ComponentLink3Description=https://datasheet.ciiva.com/11466/upy-gphc-x7r-6-3v-to-50v-8-11466414.pdf?src-supplier=Avnet, ComponentLink3URL=https://datasheet.ciiva.com/11466/upy-gphc-x7r-6-3v-to-50v-8-11466414.pdf?src-supplier=Avnet, ComponentLink4Description=https://datasheet.ciiva.com/13208/upy-gphc-x7r-6-3v-to-50v-8-12304-13208543.pdf?src-supplier=Mouser, ComponentLink4URL=https://datasheet.ciiva.com/13208/upy-gphc-x7r-6-3v-to-50v-8-12304-13208543.pdf?src-supplier=Mouser, Composition=Ceramic, Depth=0.5mm, Halogen Free="Halogen Free", Height=0.5mm, Lead Free="Lead Free", Length=1mm, Mount="Surface Mount", Number of Pins=2, Packaging="Tape and Reel", Pricing 1="1 = 0,10000, 10 = 0,03000, 100 = 0,01350, 500 = 0,00966, 1000 = 0,00759, 2500 = 0,00690, 5000 = 0,00635 (USD)", Radiation Hardening=No, RoHS=Yes, Stock 1=116423, Supplier 1=Digi-Key, Termination=SMD/SMT, Thickness=0.022inch, Voltage Rating=50V, Voltage Rating (DC)=50V, Weight=2.3E-05oz, Width=0.02inch
C637 C638 C645 C646: library part Capacitor, "CAP CER 1200PF 50V X7R 0402", Case Code (Imperial)=0402, Case Code (Metric)=1005, Dielectric=X7R, Manufacturer=Yageo, Manufacturer Part Number=CC0402KRX7R9BB122, Max Operating Temperature=125°C, Min Operating Temperature=-55°C, Package Quantity=1, Supplier Part Number 1=311-1031-1-ND, Tolerance=10%, Voltage Rating=50V, Capacitance=1.2nF, Case/Package=0402, Category="Ceramic Capacitors", ComponentLink1Description=https://datasheet.ciiva.com/26862/getdatasheetpartid-403475-26862644.pdf?src-supplier=Verical, ComponentLink1URL=https://datasheet.ciiva.com/26862/getdatasheetpartid-403475-26862644.pdf?src-supplier=Verical, ComponentLink2Description=https://datasheet.ciiva.com/143/mlccorderingcode-143979.pdf?src-supplier=Digi-Key, ComponentLink2URL=https://datasheet.ciiva.com/143/mlccorderingcode-143979.pdf?src-supplier=Digi-Key, ComponentLink3Description=https://datasheet.ciiva.com/143/mlccorderingcode-143977.pdf?src-supplier=Digi-Key, ComponentLink3URL=https://datasheet.ciiva.com/143/mlccorderingcode-143977.pdf?src-supplier=Digi-Key, ComponentLink4Description=https://datasheet.ciiva.com/13209/upy-gphc-x7r-6-3v-to-50v-8-12304-13209337.pdf?src-supplier=Mouser, ComponentLink4URL=https://datasheet.ciiva.com/13209/upy-gphc-x7r-6-3v-to-50v-8-12304-13209337.pdf?src-supplier=Mouser, ComponentLink5Description=https://datasheet.ciiva.com/17437/upy-gphc-x7r-6-3v-to-50v-8-17437177.pdf?src-supplier=Avnet+Europe, ComponentLink5URL=https://datasheet.ciiva.com/17437/upy-gphc-x7r-6-3v-to-50v-8-17437177.pdf?src-supplier=Avnet+Europe, ComponentLink6Description=https://datasheet.ciiva.com/143/mlccorderingcode-143978.pdf?src-supplier=Digi-Key, ComponentLink6URL=https://datasheet.ciiva.com/143/mlccorderingcode-143978.pdf?src-supplier=Digi-Key, Composition=Ceramic, Depth=0.5mm, Halogen Free="Halogen Free", Height=0.5mm, Lead Free="Lead Free", Length=1mm, Mount="Surface Mount", Number of Pins=2, Packaging="Tape and Reel", Pricing 1="1=0,10000, 10=0,03100, 100=0,01370, 500=0,00982, 1000=0,00771, 2500=0,00701, 5000=0,00645 (USD)", Radiation Hardening=No, RoHS=Yes, Stock 1=202147, Supplier 1=Digi-Key, Termination=SMD/SMT, Thickness=0.022inch, Voltage Rating (DC)=50V, Weight=2.3E-05oz, Width=0.02inch
C639 C640 C647 C648: library part Capacitor, Case/Package=0402, Case Code (Metric)=1005, Dielectric=X7R, Insulation Resistance=10GR, Manufacturer=Yageo, Manufacturer Part Number=CC0402KRX7R8BB473, Max Operating Temperature=125°C, Min Operating Temperature=-55°C, Supplier Part Number 1=311-1717-1-ND, Tolerance=10%, Voltage Rating=25V, Capacitance=47nF, Case Code (Imperial)=0402, ComponentLink1Description=http://www.mouser.com/ds/2/447/Yageo_UPY-GP_NP0_16V-to-50V_9-358835.pdf?src-supplier=Mouser, ComponentLink1URL=http://www.mouser.com/ds/2/447/Yageo_UPY-GP_NP0_16V-to-50V_9-358835.pdf?src-supplier=Mouser, ComponentLink2Description=http://components.arrow.com/part/dataview/0323_02822063?src-supplier=Arrow+Europe, ComponentLink2URL=http://components.arrow.com/part/dataview/0323_02822063?src-supplier=Arrow+Europe, ComponentLink3Description=http://www.yageo.com/documents/recent/UPY-GPHC_X7R_6.3V-to-50V_18.pdf?src-supplier=Digi-Key, ComponentLink3URL=http://www.yageo.com/documents/recent/UPY-GPHC_X7R_6.3V-to-50V_18.pdf?src-supplier=Digi-Key, ComponentLink4Description=http://www.yageo.com/exep/pages/download/literatures/ProductSelectionGuide%202014_Final_2.pdf?src-supplier=Digi-Key, ComponentLink4URL=http://www.yageo.com/exep/pages/download/literatures/ProductSelectionGuide%202014_Final_2.pdf?src-supplier=Digi-Key, ComponentLink5Description=http://www.yageo.com/documents/recent/UPY-GPHC_X7R_6.3V-to-50V_10.pdf?src-supplier=Future+Electronics, ComponentLink5URL=http://www.yageo.com/documents/recent/UPY-GPHC_X7R_6.3V-to-50V_10.pdf?src-supplier=Future+Electronics, Composition=Ceramic, Depth=0.5mm, Dissipation Factor=3.5%, Halogen Free="Halogen Free", Lead Free="Lead Free", Length=0.039inch, Mount="Surface Mount", Packaging="Tape and Reel", Pricing 1="1 = 0,10000, 10 = 0,03800, 100 = 0,01710, 500 = 0,01224, 1000 = 0,00962, 2500 = 0,00874, 5000 = 0,00805 (USD)", RoHS=Yes, Stock 1=136338, Supplier 1=Digi-Key, Termination=SMD/SMT, Thickness=0.022inch, Voltage Rating (DC)=25V, Weight=2.3E-05oz, Width=0.02inch
C641: library part Capacitor, Case/Package=0402, Dielectric=X7R, Dielectric Material=Ceramic, Manufacturer=KEMET, Manufacturer Part Number=C0402C471K5RACTU, Max Operating Temperature=125°C, Min Operating Temperature=-55°C, Supplier Part Number 1=399-1025-1-ND, Tolerance=10%, Voltage=50V, Capacitance=470pF, ComponentLink1Description=https://datasheet.ciiva.com/7747/kem-c1002-x7r-smd-7747647.pdf?src-supplier=Element14, ComponentLink1URL=https://datasheet.ciiva.com/7747/kem-c1002-x7r-smd-7747647.pdf?src-supplier=Element14, ComponentLink2Description=https://datasheet.ciiva.com/6126/kem-c1002-x7r-smd-6126681.pdf?src-supplier=Farnell, ComponentLink2URL=https://datasheet.ciiva.com/6126/kem-c1002-x7r-smd-6126681.pdf?src-supplier=Farnell, Contact Plating=Tin,Matte, Depth=0.5mm, Height=0.5mm, Length=1mm, Mount="Surface Mount", Packaging="Tape and Reel", Pricing 1="1 = 0,10000, 10 = 0,03300, 100 = 0,01490, 500 = 0,01062, 1000 = 0,00835, 2500 = 0,00759, 5000 = 0,00698 (USD)", Radiation Hardening=No, RoHS=Yes, Stock 1=1606299, Supplier 1=Digi-Key, Termination=SMD/SMT, Voltage Rating (DC)=50V
C642: library part Capacitor, Case/Package=0402, Case Code (Metric)=1005, Dielectric=C0G, Manufacturer=Yageo, Manufacturer Part Number=CC0402JRNPO9BN560, Max Operating Temperature=125°C, Min Operating Temperature=-55°C, Package Quantity=1, Supplier Part Number 1=311-1022-1-ND, Tolerance=5%, Voltage Rating=50V, Capacitance=56pF, Case Code (Imperial)=0402, ComponentLink1Description=https://datasheet.ciiva.com/144/mlccorderingcode-144004.pdf?src-supplier=Digi-Key, ComponentLink1URL=https://datasheet.ciiva.com/144/mlccorderingcode-144004.pdf?src-supplier=Digi-Key, ComponentLink2Description=https://datasheet.ciiva.com/144/mlccorderingcode-144005.pdf?src-supplier=Digi-Key, ComponentLink2URL=https://datasheet.ciiva.com/144/mlccorderingcode-144005.pdf?src-supplier=Digi-Key, ComponentLink3Description=https://datasheet.ciiva.com/11587/upy-gp-np0-16v-to-50v-8-11587093.pdf?src-supplier=Avnet, ComponentLink3URL=https://datasheet.ciiva.com/11587/upy-gp-np0-16v-to-50v-8-11587093.pdf?src-supplier=Avnet, ComponentLink4Description=https://datasheet.ciiva.com/144/mlccorderingcode-144006.pdf?src-supplier=Digi-Key, ComponentLink4URL=https://datasheet.ciiva.com/144/mlccorderingcode-144006.pdf?src-supplier=Digi-Key, ComponentLink5Description=https://datasheet.ciiva.com/13208/upy-gp-np0-16v-to-50v-8-13208374.pdf?src-supplier=Mouser, ComponentLink5URL=https://datasheet.ciiva.com/13208/upy-gp-np0-16v-to-50v-8-13208374.pdf?src-supplier=Mouser, ComponentLink6Description=https://datasheet.ciiva.com/26862/getdatasheetpartid-403455-26862602.pdf?src-supplier=Verical, ComponentLink6URL=https://datasheet.ciiva.com/26862/getdatasheetpartid-403455-26862602.pdf?src-supplier=Verical, ComponentLink7Description=https://datasheet.ciiva.com/28450/1443161-28450271.pdf?src-supplier=Element14, ComponentLink7URL=https://datasheet.ciiva.com/28450/1443161-28450271.pdf?src-supplier=Element14, Composition=Ceramic, Depth=0.5mm, Height=0.5mm, Lead Free="Lead Free", Length=1mm, Mount="Surface Mount", Number of Pins=2, Packaging="Tape and Reel", Pricing 1="1 = 0,10000, 10 = 0,02300, 100 = 0,01030, 500 = 0,00736, 1000 = 0,00578, 2500 = 0,00525, 5000 = 0,00483 (USD)", Radiation Hardening=No, REACH SVHC="No SVHC", RoHS=Yes, Stock 1=531196, Supplier 1=Digi-Key, Termination=SMD/SMT, Thickness=0.022inch, Voltage Rating (DC)=50V, Weight=2.3E-05oz, Width=0.02inch
C643: library part Capacitor, Case/Package=0402, Case Code (Metric)=1005, Dielectric=X7R, Manufacturer=Yageo, Manufacturer Part Number=CC0402KRX7R7BB822, Max Operating Temperature=125°C, Min Operating Temperature=-55°C, Package Quantity=1, Supplier Part Number 1=311-1041-1-ND, Tolerance=10%, Voltage Rating=16V, Capacitance=8.2nF, Case Code (Imperial)=0402, ComponentLink1Description=https://datasheet.ciiva.com/26862/getdatasheetpartid-407631-26862637.pdf?src-supplier=Verical, ComponentLink1URL=https://datasheet.ciiva.com/26862/getdatasheetpartid-407631-26862637.pdf?src-supplier=Verical, ComponentLink2Description=https://datasheet.ciiva.com/155/mlccorderingcode-155857.pdf?src-supplier=Digi-Key, ComponentLink2URL=https://datasheet.ciiva.com/155/mlccorderingcode-155857.pdf?src-supplier=Digi-Key, ComponentLink3Description=https://datasheet.ciiva.com/17437/upy-gphc-x7r-6-3v-to-50v-8-17437354.pdf?src-supplier=Avnet+Europe, ComponentLink3URL=https://datasheet.ciiva.com/17437/upy-gphc-x7r-6-3v-to-50v-8-17437354.pdf?src-supplier=Avnet+Europe, ComponentLink4Description=https://datasheet.ciiva.com/11464/upy-gphc-x7r-6-3v-to-50v-8-11464887.pdf?src-supplier=Avnet, ComponentLink4URL=https://datasheet.ciiva.com/11464/upy-gphc-x7r-6-3v-to-50v-8-11464887.pdf?src-supplier=Avnet, ComponentLink5Description=https://datasheet.ciiva.com/155/mlccorderingcode-155858.pdf?src-supplier=Digi-Key, ComponentLink5URL=https://datasheet.ciiva.com/155/mlccorderingcode-155858.pdf?src-supplier=Digi-Key, ComponentLink6Description=https://datasheet.ciiva.com/155/mlccorderingcode-155859.pdf?src-supplier=Digi-Key, ComponentLink6URL=https://datasheet.ciiva.com/155/mlccorderingcode-155859.pdf?src-supplier=Digi-Key, Depth=0.5mm, Halogen Free="Halogen Free", Height=0.5mm, Lead Free="Lead Free", Length=1mm, Mount="Surface Mount", Packaging="Tape and Reel", Pricing 1="1 = 0,10000, 10 = 0,02500, 100 = 0,01090, 500 = 0,00782, 1000 = 0,00614, 2500 = 0,00558, 5000 = 0,00514 (USD)", Radiation Hardening=No, RoHS=Yes, Stock 1=137774, Supplier 1=Digi-Key, Termination=SMD/SMT, Thickness=0.022inch, Voltage Rating (DC)=16V, Width=0.02inch
C644: library part Capacitor, Case/Package=0402, Case Code (Metric)=1005, Dielectric=X7R, Manufacturer=Yageo, Manufacturer Part Number=CC0402KRX7R9BB821, Max Operating Temperature=125°C, Min Operating Temperature=-55°C, Package Quantity=10000, Supplier Part Number 1=311-1727-1-ND, Tolerance=10%, Voltage=50V, Capacitance=820pF, Case Code (Imperial)=0402, ComponentLink1Description=https://datasheet.ciiva.com/11786/0900766b80d84f1d-11786151.pdf?src-supplier=RSComponents, ComponentLink1URL=https://datasheet.ciiva.com/11786/0900766b80d84f1d-11786151.pdf?src-supplier=RSComponents, ComponentLink2Description=https://datasheet.ciiva.com/26862/getdatasheetpartid-495580-26862654.pdf?src-supplier=Verical, ComponentLink2URL=https://datasheet.ciiva.com/26862/getdatasheetpartid-495580-26862654.pdf?src-supplier=Verical, ComponentLink3Description=https://datasheet.ciiva.com/11587/upy-gphc-x7r-6-3v-to-50v-8-11587306.pdf?src-supplier=Avnet, ComponentLink3URL=https://datasheet.ciiva.com/11587/upy-gphc-x7r-6-3v-to-50v-8-11587306.pdf?src-supplier=Avnet, ComponentLink4Description=https://datasheet.ciiva.com/13210/upy-gphc-x7r-6-3v-to-50v-8-12304-13210429.pdf?src-supplier=Mouser, ComponentLink4URL=https://datasheet.ciiva.com/13210/upy-gphc-x7r-6-3v-to-50v-8-12304-13210429.pdf?src-supplier=Mouser, ComponentLink5Description=https://datasheet.ciiva.com/16623/upy-gphc-x7r-6-3v-to-50v-8-16623934.pdf?src-supplier=Avnet+Europe, ComponentLink5URL=https://datasheet.ciiva.com/16623/upy-gphc-x7r-6-3v-to-50v-8-16623934.pdf?src-supplier=Avnet+Europe, Composition=Ceramic, Depth=0.5mm, Halogen Free="Halogen Free", Height=0.5mm, Lead Free="Lead Free", Length=1mm, Mount="Surface Mount", Number of Pins=2, Packaging="Tape and Reel", Pricing 1="1 = 0,10000, 10 = 0,03600, 100 = 0,01620, 500 = 0,01156, 1000 = 0,00908, 2500 = 0,00825, 5000 = 0,00759 (USD)", Radiation Hardening=No, RoHS=Yes, Stock 1=31098, Supplier 1=Digi-Key, Termination=SMD/SMT, Thickness=0.022inch, Voltage Rating=50V, Voltage Rating (DC)=50V, Width=0.02inch
C650: library part Capacitor, Case/Package=0402, Case Code (Metric)=1005, Dielectric=C0G, Manufacturer=Yageo, Manufacturer Part Number=CC0402JRNPO9BN181, Max Operating Temperature=125°C, Min Operating Temperature=-55°C, Supplier Part Number 1=311-1663-1-ND, Tolerance=5%, Voltage Rating=50V, Capacitance=180pF, Case Code (Imperial)=0402, ComponentLink1Description=https://datasheet.ciiva.com/7656/1132289-7656613.pdf?src-supplier=Element14, ComponentLink1URL=https://datasheet.ciiva.com/7656/1132289-7656613.pdf?src-supplier=Element14, ComponentLink2Description=https://datasheet.ciiva.com/17434/upy-gp-np0-16v-to-50v-8-17434342.pdf?src-supplier=Avnet+Europe, ComponentLink2URL=https://datasheet.ciiva.com/17434/upy-gp-np0-16v-to-50v-8-17434342.pdf?src-supplier=Avnet+Europe, ComponentLink3Description=https://datasheet.ciiva.com/26829/getdatasheetpartid-316982-26829286.pdf?src-supplier=Verical, ComponentLink3URL=https://datasheet.ciiva.com/26829/getdatasheetpartid-316982-26829286.pdf?src-supplier=Verical, Composition=Ceramic, Depth=0.5mm, Lead Free="Lead Free", Length=1mm, Mount="Surface Mount", Number of Pins=2, Packaging="Tape and Reel", Pricing 1="1 = 0,10000, 10 = 0,05100, 100 = 0,02250, 500 = 0,01610, 1000 = 0,01264, 2500 = 0,01150, 5000 = 0,01058 (USD)", Radiation Hardening=No, REACH SVHC="No SVHC", RoHS=Yes, Stock 1=26996, Supplier 1=Digi-Key, Termination=SMD/SMT, Thickness=0.022inch, Voltage Rating (DC)=50V, Weight=2.3E-05oz, Width=0.5mm